# Altium PCB SOM_PCB.PcbDoc (part 4 of 5)
Units mil, origin at the board's own origin, x right, y up, seen from the top; angles counter-clockwise.
Board outline 6000 x 4000 mil, 8 copper layers (Top Layer, Int1 (Sign), Int2 (GND), Int3 (Sign), Int4 (Sign), Int5 (PWR), Int6 (Sign), Bottom Layer), stack 60.424 mil thick; 76 components, 194 nets, 972 pads, 571 vias.
Unrouted connection lines stored in the file: 54.
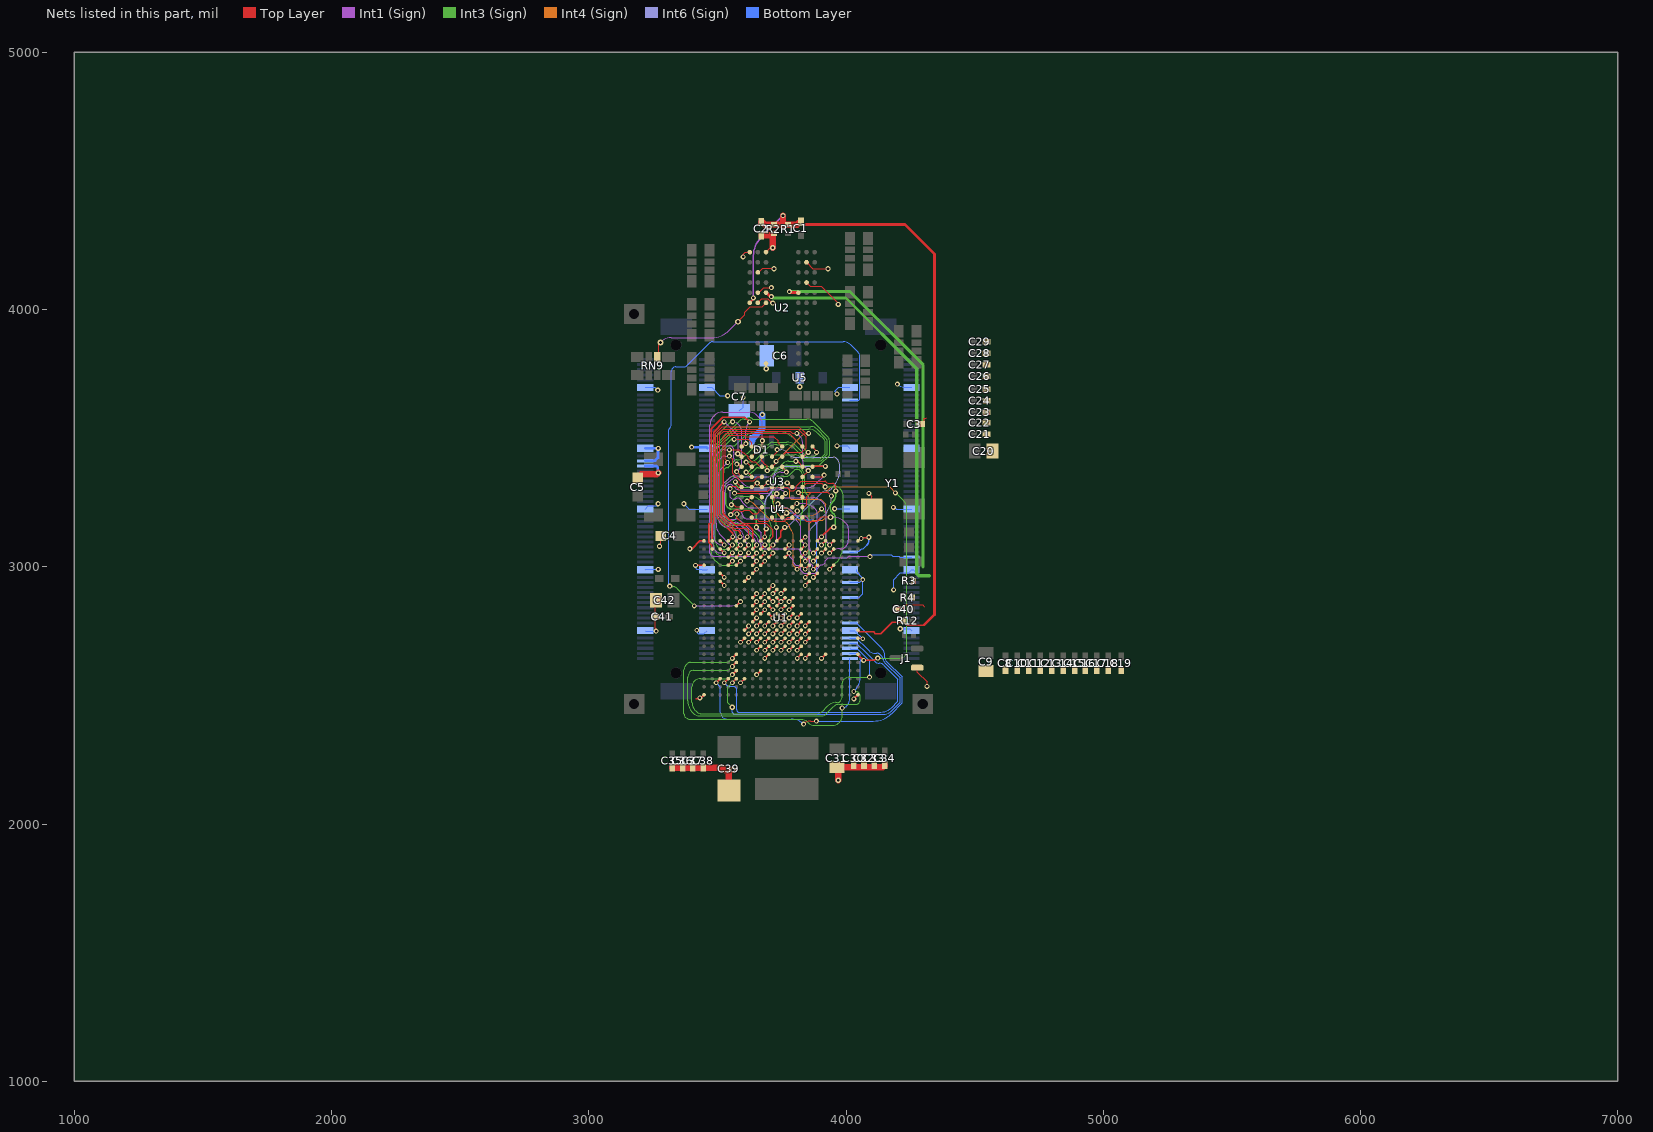
[diagram p9: the nets of this part, all layers, seen from the top]

## Via types
v1: diameter 19, hole 10, Top Layer to Bottom Layer, 330 vias
v2: diameter 20, hole 10, Top Layer to Bottom Layer, 235 vias
v3: diameter 23, hole 11.81, Top Layer to Bottom Layer, 6 vias

## Nets (pads, with @x,y where several pads share a name; then routed paths per layer and width w, separated by ;. In a path a pad name is that pad's centre, name@x,y a point inside that pad or via, vN(x,y) a via of type N, cw(c..) or ccw(c..) an arc to the next point about the centre after c; other vN are vias at no path point) (continued)
DDR_RES_DQM1: RN9.6 U2.F3 | length 528
  Top Layer w4: RN9.6@3271.35,3825 3271.35,3872.48 v3(3279.08,3872.5) ; v3(3580,3952.5) 3606.52,3979.02 3606.52,3989.15 3628.63,4011.26 3674.02,4011.26 U2.F3@3689.02,4026.26
  Int1 (Sign) w4: v3(3279.08,3872.5) 3280.02,3873.44 cw(c3320,3833.47) 3320,3890 3476.08,3890 ccw(c3476.08,3990) 3546.79,3919.29 v3(3580,3952.5)
DDR_RES_DQS0: R3.2 U2.E7 | length 1461.8
  Top Layer w12: v2(3779.94,4069.82) 3782.11,4069.82 3786.3,4065.63 U2.E7@3815,4065.63 ; R3.2@4262.52,2945 R3.2@4262.52,2946.77
  Int3 (Sign) w12: v2(3779.94,4069.82) 3780.12,4070 4015,4070 4300,3785 4300,3000
DDR_RES_DQS1: R4.2 U2.E3 | length 1566.8
  Top Layer w12: U2.E3@3689.02,4065.63 3690.64,4065.63 3704.74,4051.53 3708.47,4051.53 v2(3710,4050) ; R4.2@4257.52,2880 R4.2@4257.52,2887.52
  Int3 (Sign) w12: v2(3710,4050) 3715,4045 4000,4045 4275,3770 4275,2972.03 4282.03,2965 4325,2965
DDR_VREF: C1.1 C2.2 R1.1 R2.2 R12.2 U1.M20 U2.F1 | length 2908.6
  Top Layer w5: U2.F1@3626.02,4026.26 3640,4040.24 v2(3640,4045) ; U1.M20@4046.46,2754.02 4053.47,2747 4106.94,2747 4114.44,2739.5 4135.56,2739.5 4179.56,2783.5 4215.98,2783.5 R12.2@4222.48,2790 4222.48,2788.23 4239.02,2771.69 4301.69,2771.69 4305,2775
  Top Layer w10: C1.1@3823.34,4338.11 3830.84,4330.61 4229.39,4330.61 4344,4216 4344,2814 4305,2775
  Top Layer w25: C2.2@3670,4340 3670,4338.24 3671.66,4336.58 3678.14,4336.58 3684.64,4330.08 3719.96,4330.08 R2.2@3720,4330.04 3755.01,4330.04 ; v2(3755,4365) 3755.01,4330.04 ; C1.1@3823.34,4338.11 3818.42,4338.11 3810.36,4330.04 R1.1@3775,4330 R1.1@3775,4330 R1.1@3775,4330 3755.01,4330.04
  Int1 (Sign) w5: v2(3640,4045) 3640,4208.66 cw(c3740,4208.66) 3669.29,4279.37 v2(3755,4365) v2(3755,4365)
DR0PRI: U1.J5 U4.94 | length 2185.7
  Top Layer w5: U1.J5@3574.02,2848.5 v1(3589.76,2864.25)
  Int1 (Sign) w3: v1(3410,2848) 3550.53,2848 ccw(c3550.53,2903.49) v1(3589.76,2864.25)
  Int3 (Sign) w3: 3395,2863.5 3410,2848.5 v1(3410,2848)
  Int3 (Sign) w4: v2(3315,2925) 3317.5,2922.5 3326.75,2922.5 cw(c3326.75,2900.17) 3342.54,2915.96 3395,2863.5
  Bottom Layer w4: v2(3315,2925) cw(c3324.66,2934.66) 3311,2934.66 3311,3532.11 cw(c3319.54,3532.11) 3313.49,3538.14 3316,3540.65 ccw(c3303.93,3552.72) 3321,3552.72 3321,3759.98 cw(c3338.02,3759.98) 3325.97,3772 ; 3325.98,3772.02 cw(c3338.02,3759.98) 3338.02,3777 3365.69,3777 ccw(c3365.69,3804.31) 3384.99,3784.99 3470,3870 cw(c3482.07,3857.93) 3482.07,3875 3988.69,3875 cw(c3988.69,3833.69) 4017.85,3862.96 cw(c3988.69,3833.69) 4017.9,3862.9 4045.65,3835.15 cw(c4025.5,3815) 4054,3815 4054,3651.79 4050.15,3647.94 4015.19,3647.94 U4.94@4015,3647.76
F\L\A\S\H\_\A\S\M\0\: U1.A10 U3.B4 | length 713.8
  Top Layer w4: U3.B4@3712.52,3428.11 3713.32,3428.11 3732.2,3447 v2(3732.2,3455.35)
  Top Layer w5: U1.A10@3731.5,3100.47 3747.24,3116.22 3747.24,3138.24 v2(3762,3153)
  Int6 (Sign) w4: v2(3732.2,3455.35) 3745.94,3455.35 cw(c3745.94,3422.19) 3769.37,3445.64 ; v2(3762,3153) ccw(c3762,3175.63) 3768.65,3154 ccw(c3762,3175.63) 3778,3159.63 3905.15,3286.78 cw(c3925,3266.93) 3924.73,3295 cw(c3925,3266.93) 3924.97,3295 ccw(c3924.79,3319.66) 3942.24,3302.24 3946.63,3306.63 ccw(c3875.92,3377.34) 3975.92,3377.34 3975.92,3393.64 ccw(c3938.64,3393.64) 3965,3420 ccw(c3949.97,3404.97) 3949.97,3426.22 3802.52,3426.22 cw(c3802.52,3459.36) 3779.11,3435.91 ; 3769.38,3445.64 3779.09,3435.93
F\L\A\S\H\_\W\A\I\T\: U1.R20 U3.F7 | length 1270.9
  Top Layer w5: v2(3815,3288.13) 3830.63,3272.5 U3.F7@3830.63,3270.63 ; U1.R20@4046.46,2659.53 4046.46,2658.78 4068.29,2636.95 v1@4068.29,2636.2 ; v1(4068.65,2635.85) v1@4068.29,2636.2 ; v2(4123.43,2645) 4119.37,2645 4110.57,2636.2 v1@4068.29,2636.2
  Int3 (Sign) w4: v2(4123.43,2645) 4208.69,2645 ccw(c4208.69,2672.31) 4227.99,2652.99 ccw(c4208.69,2672.31) 4236,2672.31 4236,3230 ccw(c4200.99,3230) 4225.75,3254.75 4193.5,3287 v2(4192,3287)
  Int4 (Sign) w4: v2(3815,3288.13) 3816.87,3290 3910,3290 ccw(c3910,3318.07) 3929.85,3298.22 3933.88,3302.25 cw(c3955,3281.13) 3955,3311 4169.5,3311 4192,3288.5 v2(4192,3287)
FLASH_A1: U1.B2 U3.A1 | length 760.2
  Top Layer w5: U1.B2@3479.53,3068.98 3478.33,3070.17 3478.33,3083.74 3467.03,3095.04 3467.03,3164.53 3476.5,3174 3476.5,3536.66 3520.65,3580.81 3607.19,3580.81 3624.9,3563.09 v2(3625,3563) ; U3.A1@3594.41,3467.48 3597.06,3467.48 3608.35,3478.76 v2(3611,3478.76)
  Int1 (Sign) w4: v2(3611,3478.76) 3611,3529.2 cw(c3658.8,3529.2) 3617.78,3553.73 cw(c3658.8,3529.2) v2(3625,3563)
FLASH_A2: U1.A2 U3.B1 | length 646
  Top Layer w5: U1.A2@3479.53,3100.47 3479.53,3164.3 3485.5,3170.27 3485.5,3523.03 3525.47,3563 v2(3526.18,3563) ; v2(3579,3439.62) 3580.95,3439.62 3590.16,3430.41 U3.B1@3592.11,3430.41
  Int1 (Sign) w4: v2(3526.18,3563) 3578.75,3510.42 cw(c3573.33,3505) 3581,3505 3581,3447.16 3578.84,3445 3579.14,3444.7 3579.14,3440.67 v2(3579,3439.62)
FLASH_A3: U1.B3 U3.C1 | length 624.7
  Top Layer w4: v2(3575.71,3399.22) 3580.83,3396.94 3582.69,3396.94 3589.67,3389.96 U3.C1@3593.19,3389.96
  Top Layer w5: U1.B3@3511.02,3068.98 3511.41,3068.98 3526.39,3054 v1(3526.77,3054)
  Int1 (Sign) w3: 3479,3140 3479,3105.7 ccw(c3550.7,3105.7) 3495.27,3060.22 ccw(c3510.29,3075.24) 3503.85,3055 ccw(c3510.29,3075.24) 3510.29,3054 v1(3526.77,3054)
  Int1 (Sign) w4: 3479,3140 3479,3430 cw(c3512.8,3430) 3488.89,3453.89 3497.45,3462.45 cw(c3518.09,3441.81) 3518.09,3471 3546.05,3471 cw(c3546.05,3453.91) 3558.12,3466.01 ; 3558.13,3465.99 cw(c3545.12,3452.97) 3560.64,3462.88 cw(c3545.12,3452.97) 3563.53,3452.97 3563.53,3444.2 cw(c3559.53,3444.18) 3563.42,3443.26 ccw(c3579,3439.62) 3563,3439.74 ccw(c3579,3439.62) 3563,3439.53 ccw(c3579,3439.62) 3563.42,3435.97 cw(c3559.53,3435.05) 3563.53,3435.03 3563.53,3421.97 ccw(c3589.03,3421.97) 3563.63,3419.68 ccw(c3589.03,3421.97) 3569.9,3405.1 ccw(c3589.03,3421.97) 3571,3403.93 v2(3575.71,3399.22)
FLASH_A4: U1.D5 U3.D1 | length 954.5
  Top Layer w4: v2@3579.16,3365.84 3594.41,3350.59 U3.D1@3594.41,3349.37
  Top Layer w5: U1.D5@3574.02,3005.98 v1(3589.76,3021.73)
  Int1 (Sign) w4: v2(3559.13,3563.5) cw(c3559.13,3533.63) 3580.25,3554.75 3585,3550 cw(c3560.86,3525.86) 3595,3525.86 3595,3390 v2(3575,3370)
  Int3 (Sign) w3: 3476,3140 3476.5,3089.49 3476.5,3056.85 ccw(c3518.44,3056.85) 3476.88,3051.23 ccw(c3518.44,3056.85) 3488.78,3027.2 3499.39,3016.59 ccw(c3525,3042.2) 3525,3005.98 3551.74,3005.98 ccw(c3551.74,3059.75) v1@3589.74,3021.7
  Int3 (Sign) w4: 3476,3140 3476,3470 cw(c3517.31,3470) 3488.06,3499.17 3488.12,3499.23 3550.8,3561.91 3556.68,3563.78 v2(3559.13,3563.5)
FLASH_A5: U1.C4 U3.D2 | length 1408.4
  Top Layer w4: v2(3611.92,3367.69) 3621.38,3362.7 3633.78,3350.3 U3.D2@3633.78,3349.37
  Top Layer w5: U1.C4@3542.52,3037.48 3558.27,3053.23 v1(3558.27,3054)
  Int3 (Sign) w3: 3492,3140 3492,3101.79 ccw(c3525.29,3101.79) 3501.75,3078.25 ccw(c3525.29,3101.79) 3525.29,3068.5 3534.53,3068.5 cw(c3534.53,3046.19) 3550.3,3061.97 v1(3558.27,3054)
  Int3 (Sign) w4: 3492,3140 3492,3461.88 3575.12,3545 3863.1,3545 cw(c3863.1,3513.1) 3885.66,3535.66 3922.12,3499.19 cw(c3907.93,3485) 3928,3485 3928,3436.69 3903.31,3412 3838.94,3412 cw(c3838.94,3420) 3833.29,3414.34 3821.4,3426.22 ccw(c3800.22,3405.04) 3800.22,3435 3703.13,3435 ccw(c3703.13,3393.37) 3673.69,3422.81 3623.28,3372.39 cw(c3611.92,3383.75) v2(3611.92,3367.69)
FLASH_A6: U1.C7 U3.A2 | length 685.9
  Top Layer w4: v2(3565,3495) 3566,3496 3620.11,3496 3633.78,3482.33 U3.A2@3633.78,3467.48
  Top Layer w5: U1.C7@3637.01,3037.48 v1(3652.76,3053.23)
  Int3 (Sign) w3: 3620,3140 3631.86,3128.14 cw(c3619.45,3115.72) 3637.01,3115.72 3637.01,3078.76 ccw(c3660.63,3078.76) 3643.93,3062.06 v1(3652.76,3053.23)
  Int3 (Sign) w4: 3517.17,3177.83 cw(c3539.37,3199.99) 3508,3199.91 cw(c3539.37,3199.99) 3508,3199.99 3508,3449.56 3557.44,3499 3561.44,3495 v2(3565,3495) ; 3517.19,3177.81 3526.22,3168.78 ccw(c3545,3187.56) 3545,3161 3576.37,3161 cw(c3576.37,3106.37) 3614.98,3145.02 ; 3610,3150 3614.98,3145.02 ; 3620,3140 3614.98,3145.02
FLASH_A7: U1.C5 U3.C2 | length 1384
  Top Layer w4: v2(3611.88,3406.88) 3613.76,3406.88 3631.9,3388.74 U3.C2@3633.78,3388.74
  Top Layer w5: U1.C5@3574.02,3037.48 3589.76,3053.23 v1(3589.76,3054)
  Int3 (Sign) w3: 3572.47,3140 cw(c3556.87,3132.91) 3574.01,3132.91 3574.01,3124.35 3574,3116.23 ; 3574,3116.22 3574.01,3092.6 3574.01,3092.04 ccw(c3627.8,3092.04) 3574.01,3091.86 ccw(c3627.8,3092.04) v1(3589.76,3054)
  Int3 (Sign) w4: 3572.47,3140 ccw(c3556.87,3132.91) 3568.99,3145.03 ccw(c3552.16,3128.2) 3552.16,3152 3539.31,3152 cw(c3539.31,3179.31) 3520.01,3159.99 3507.07,3172.93 cw(c3524.14,3190) 3500,3190 3500,3458.57 3563.3,3521.87 cw(c3595,3490.17) 3595,3535 3624.3,3535 cw(c3624.3,3533.36) 3625.46,3534.52 3625.84,3534.6 3855,3534.6 cw(c3855,3486.93) 3885.37,3523.67 cw(c3855,3486.93) 3888.71,3520.64 3894.04,3515.31 3912.85,3497.15 cw(c3910.09,3494.25) 3912.93,3497.07 cw(c3895.86,3480) 3920,3480 3920,3440 3900,3420 3838.94,3420 3795.26,3463.68 ccw(c3767.93,3436.34) 3767.93,3475 3730,3475 ccw(c3730,3423.54) 3693.62,3459.93 3657.48,3423.79 cw(c3616.64,3464.63) 3616.64,3406.88 v2(3611.88,3406.88)
FLASH_A8: U1.D7 U3.A3 | length 1059.7
  Top Layer w4: U3.A3@3673.15,3467.48 3675,3469.33 v2(3675,3490)
  Top Layer w5: U1.D7@3637.01,3005.98 v1(3652.76,3021.73)
  Int1 (Sign) w3: 3471,3140 3471,3054.66 ccw(c3484.66,3054.66) 3475,3045 ccw(c3487.07,3057.07) 3487.07,3040 3634.49,3040 v1(3652.76,3021.73)
  Int1 (Sign) w4: 3471,3140 3471,3550 cw(c3521.7,3550) 3485.83,3585.83 3487.57,3587.57 ; 3487.59,3587.59 cw(c3520,3555.13) 3520,3601 3623.78,3601 cw(c3623.78,3558.52) 3653.79,3588.58 ; 3653.81,3588.56 3666.25,3576.12 cw(c3645.13,3555) 3675,3555 v2(3675,3490)
FLASH_A9: U1.C6 U3.B3 | length 1490.1
  Top Layer w4: U3.B3@3673.15,3428.11 3673.15,3412.28 ccw(c3677.15,3412.28) 3674.29,3409.49 3684.97,3398.55 ccw(c3696.4,3409.75) 3685.25,3398.27 3692.55,3391.19 cw(c3689.77,3388.3) 3693.77,3388.36 3693.77,3374.13 v2(3693.9,3374)
  Top Layer w5: U1.C6@3605.51,3037.48 3621.26,3053.23 v1(3621.26,3054)
  Int3 (Sign) w3: 3484,3140 3485.09,3101.91 3485.09,3083.84 ccw(c3530.79,3083.84) 3485.84,3075.6 ccw(c3530.79,3083.84) 3498.47,3051.53 ; 3498.49,3051.51 ccw(c3528.17,3081.22) 3528.17,3039.23 3590,3039.23 ccw(c3590,3080.9) v1@3619.45,3051.42 ; v1@3619.46,3051.43 v1@3621.26,3053.23
  Int3 (Sign) w4: 3484,3140 3484,3465.2 3584.69,3565.89 cw(c3604.27,3546.31) 3604.27,3574 3611.77,3574 ccw(c3611.77,3578) 3614.42,3575 cw(c3625,3563) 3622.92,3578.86 cw(c3625,3563) 3626.23,3578.95 cw(c3625,3563) 3635.58,3575 ccw(c3638.23,3578) 3638.23,3574 3758.32,3574 3848.27,3574 cw(c3848.27,3543.27) 3870,3565 3929.64,3505.36 cw(c3914.27,3490) 3936,3490 3936,3433.37 3900.63,3398 cw(c3891.51,3407.11) 3891.51,3394.22 3771.09,3394.22 ccw(c3771.09,3364.82) 3750.32,3385.63 ; v2(3693.9,3374) 3696.9,3377 3729.24,3377 ; 3728.34,3377 3729.24,3377 ; 3750.3,3385.61 3749.83,3385.14 cw(c3730.15,3404.85) 3730.23,3377 cw(c3730.15,3404.85) 3730.15,3377 3729.24,3377
FLASH_A10: U1.A3 U3.C3 | length 617.1
  Top Layer w4: v2(3546.5,3454.12) 3547.99,3455.62 3585.77,3455.62 3598.77,3442.61 3603.39,3442.61 3619.28,3426.72 3619.28,3422.1 3633.44,3407.95 3647.05,3407.95 3663.77,3391.23 3670.66,3391.23 U3.C3@3673.15,3388.74
  Top Layer w5: U1.A3@3511.02,3100.47 v1(3526.77,3084.72)
  Int1 (Sign) w3: 3487,3140 3487,3114.31 ccw(c3514.31,3114.31) 3495,3095 ccw(c3519.81,3119.81) 3519.81,3084.72 v1(3526.77,3084.72)
  Int1 (Sign) w4: 3487,3140 3487,3410 cw(c3528.04,3410) 3499.02,3439.02 3507.01,3447.01 cw(c3526.3,3427.72) 3526.3,3455 3545.62,3455 v2(3546.5,3454.12)
FLASH_A11: U1.B4 U3.D3 | length 632.8
  Top Layer w4: v2(3546.5,3430) 3559,3417.5 3559,3363.37 3576.37,3346 3576.63,3346 3587.76,3334.87 3602.24,3334.87 3602.37,3335 3627.63,3335 3627.76,3334.87 3642.24,3334.87 3656.74,3349.37 U3.D3@3673.15,3349.37
  Top Layer w5: U1.B4@3542.52,3068.98 v1(3558.27,3084.72)
  Int1 (Sign) w3: 3501.13,3140 ccw(c3563.28,3168.28) 3515,3120 3544.62,3090.38 ccw(c3558.27,3104.02) v1(3558.27,3084.72)
  Int1 (Sign) w4: 3501.13,3140 cw(c3563.28,3168.28) 3495,3168.28 3495,3390 cw(c3531.21,3390) 3505.61,3415.61 3512.8,3422.8 cw(c3530.18,3405.43) 3530.18,3430 v2(3546.5,3430)
FLASH_A12: U1.A4 U3.C4 | length 1034
  Top Layer w4: 3540.37,3150.37 3494,3196.74 3494,3519.51 3519.49,3545 3816.46,3545 3841.29,3520.17 v2(3854.44,3518.6) ; U3.C4@3712.52,3388.74 3713.74,3388.74 3729.56,3404.56 3729.56,3406.22 v2(3728.53,3409.57)
  Top Layer w5: 3540.37,3150.37 3560,3130.74 3560,3118.15 v1(3559.61,3116.41) ; U1.A4@3542.52,3100.47 3544,3100.47 v1@3560,3116.48
  Int4 (Sign) w4: v2(3728.53,3409.57) 3825.62,3506.66 cw(c3854.44,3477.84) v2(3854.44,3518.6)
FLASH_A13: U1.B5 U3.A5 | length 744.4
  Top Layer w4: v2(3539.57,3405.43) 3538.74,3409.88 3530.5,3418.13 3530.5,3499.44 3542.06,3511 3606.12,3511 3611.12,3506 3719.37,3506 3736.39,3488.99 3736.39,3482.98 U3.A5@3751.89,3467.48
  Top Layer w5: U1.B5@3574.02,3068.98 v1(3589.76,3084.72)
  Int1 (Sign) w3: 3564.1,3140 cw(c3527.67,3111.38) 3574,3111.38 ccw(c3600.3,3111.38) 3581.69,3092.8 v1(3589.76,3084.72)
  Int1 (Sign) w4: 3514.47,3380.47 ccw(c3539.85,3355.15) 3504,3355.15 3504,3191.56 ccw(c3541.56,3191.56) 3515,3165 ccw(c3539.14,3189.14) 3534.71,3155.29 3541.19,3155.29 cw(c3541.19,3135.76) 3544.54,3155 cw(c3541.19,3135.76) 3555,3149.57 3560.43,3144.14 cw(c3527.67,3111.38) 3564.1,3140 ; 3514.5,3380.5 3539.43,3405.43 v2(3539.57,3405.43)
FLASH_A14: U1.A5 U3.B5 | length 982
  Top Layer w4: U1.A5@3574.02,3100.47 U1.A5@3574.02,3101.35 ; 3582.24,3140 3581.24,3141 3562.69,3141 3506.5,3197.19 3502,3201.69 3502,3504.88 3502,3516.2 3520.8,3535 3815.15,3535 3845.13,3505.02 3845.13,3461.47 3828.04,3444.38 3768.16,3444.38 U3.B5@3751.89,3428.11 ; v1@3588,3115.34 v1(3588,3116.22)
  Top Layer w5: U1.A5@3574.02,3101.35 v1@3588,3115.34 ; 3582.24,3140 3589.26,3132.97 v1@3589.26,3116.72
FLASH_A15: U1.B6 U3.C5 | length 607.4
  Top Layer w4: U3.C5@3751.89,3388.74 3751.89,3386.93 3767.31,3371.5 3767.31,3371.07 v2(3768.51,3368.21)
  Top Layer w5: U1.B6@3605.51,3068.98 v1(3621.26,3084.72)
  Int1 (Sign) w3: 3590.4,3140 3593.37,3137.03 ; 3593.38,3137.02 cw(c3572.53,3116.19) 3602,3116.19 ccw(c3631.47,3116.19) 3610.62,3095.37 ; 3610.63,3095.35 v1(3621.26,3084.72)
  Int1 (Sign) w4: 3520.62,3183.07 3529.24,3174.44 ccw(c3552.04,3197.24) 3552.04,3165 cw(c3552.04,3132.76) 3574.82,3155.57 ; 3520.61,3183.08 cw(c3541.43,3203.88) 3512,3203.88 3512,3292.93 cw(c3557.07,3292.93) 3525.2,3324.8 3545.37,3344.97 cw(c3567.17,3323.17) 3567.17,3354 3593.22,3354 cw(c3593.22,3344.42) 3600,3351.19 ccw(c3602.88,3354.07) 3602.88,3350 3703.44,3350 ccw(c3703.44,3386.94) 3718.42,3353.17 ccw(c3703.44,3386.94) 3729.56,3360.82 cw(c3747.41,3342.97) 3747.41,3368.21 v2(3768.51,3368.21) ; 3574.84,3155.56 3590.4,3140
FLASH_A16: U1.A6 U3.D7 | length 1001.8
  Top Layer w4: v1@3618.63,3113.59 3621.26,3116.22 3621.26,3143.74 3615,3150 3565,3150 3510,3205 3510,3512.88 3524.12,3527 3782.42,3527 3790.83,3518.6 v2(3808.92,3518.6) ; U3.D7@3830.63,3349.37 3853,3371.74 v2(3853,3374)
  Top Layer w5: U1.A6@3605.51,3100.47 3605.51,3102.91 3616.19,3113.58 3618.62,3113.58 v1(3616,3116.21)
  Int1 (Sign) w4: v2(3808.92,3518.6) 3822.85,3504.66 cw(c3803.19,3485) 3831,3485 3831,3410 ccw(c3864.06,3410) 3840.68,3386.62 3853,3374.3 v2(3853,3374)
FLASH_A17: U1.B7 U3.D8 | length 804.1
  Top Layer w4: U3.D8@3870,3349.37 3909.37,3349.37 3914.63,3354.63 v2(3914.63,3356.55)
  Top Layer w5: U1.B7@3637.01,3068.98 v1(3652.76,3084.72)
  Int1 (Sign) w3: 3612.01,3140 3642.48,3109.52 cw(c3617.69,3084.72) v1(3652.76,3084.72)
  Int1 (Sign) w4: 3581.31,3341.31 3596.07,3326.56 ccw(c3640.88,3371.37) 3640.88,3308 3851.03,3308 ccw(c3851.03,3348.97) 3880,3320 3914.63,3354.63 v2(3914.63,3356.55) ; 3581.3,3341.33 ccw(c3570,3330) 3570,3346 ccw(c3570,3330) 3560.15,3342.61 3534.75,3322.78 ccw(c3549.51,3303.86) 3532.54,3320.83 3530.85,3319.13 ccw(c3557.07,3292.93) 3520,3292.93 3520,3210 ccw(c3556.21,3210) 3530.61,3184.39 3532.56,3182.44 ccw(c3555.36,3205.24) 3555.36,3173 3568.71,3173 cw(c3568.71,3148.15) 3586.29,3165.72 3612.01,3140
FLASH_A18: U1.A7 U3.A7 | length 818.5
  Top Layer w4: 3523,3414.13 3522.5,3414.63 3522.5,3507.5 3534,3519 3779.11,3519 U3.A7@3830.63,3467.48
  Top Layer w5: 3523,3414.13 3523,3207 3569.11,3160.89 3620,3160.89 3637.01,3143.88 U1.A7@3637.01,3100.47
FLASH_A19: U1.C8 U3.B7 | length 943.6
  Top Layer w4: U3.B7@3830.63,3428.11 3833.64,3428.11 3849.53,3444 3851.03,3444 v2(3853.25,3444.6)
  Top Layer w5: U1.C8@3668.5,3037.48 v1(3684.25,3053.23)
  Int3 (Sign) w3: 3641.44,3140 3656.83,3124.62 cw(c3628.63,3096.42) 3668.5,3096.42 3668.5,3082.7 ccw(c3701.63,3082.7) v1@3678.2,3059.28 ; v1@3678.21,3059.27 v1(3684.25,3053.23)
  Int3 (Sign) w4: 3641.44,3140 3621.24,3160.2 ccw(c3600,3138.96) 3600,3169 3555,3169 cw(c3555,3200.39) 3532.81,3178.19 3523.07,3187.93 cw(c3540.14,3205) 3516,3205 3516,3446.25 3539.87,3470.12 3567.11,3470.12 3592.7,3495.71 cw(c3663.41,3425) 3663.41,3525 3735,3525 cw(c3735,3436.8) 3797.37,3499.17 3851.06,3445.48 v2(3853.25,3444.6)
FLASH_A20: U1.B8 U3.C7 | length 711.9
  Top Layer w4: v2(3805.19,3410.22) 3811.96,3410.22 3830.63,3391.56 U3.C7@3830.63,3388.74
  Top Layer w5: U1.B8@3668.5,3068.98 v1(3684.66,3085.14)
  Int1 (Sign) w3: 3662.5,3140 3670,3132.5 3670,3098.98 3683.84,3085.14 v1(3684.66,3085.14)
  Int1 (Sign) w5: v2@3655,3147.5 3662.5,3140
  Int3 (Sign) w4: 3532,3284.94 3532,3325 cw(c3546.97,3325) 3536.39,3335.59 3545.3,3344.5 cw(c3565,3311.96) 3565,3350 3605.34,3350 ccw(c3605.34,3379.66) 3626.31,3358.69 3648.88,3381.25 cw(c3657.92,3372.21) 3657.92,3385 3680.67,3385 ccw(c3680.67,3389) 3683.32,3386 cw(c3693.9,3374) 3693.9,3390 cw(c3693.9,3374) 3704.48,3386 ccw(c3707.13,3389) 3707.13,3385 3728.36,3385 3728.43,3385 3730.15,3385 ccw(c3730.15,3404.85) 3730.21,3385 ccw(c3730.15,3404.85) 3744.19,3390.81 3753.89,3400.52 ; 3753.9,3400.53 cw(c3777.32,3377.09) 3777.32,3410.22 v2(3805.19,3410.22)
  Int3 (Sign) w5: 3532.5,3284.94 3532.5,3244.62 ccw(c3537.5,3244.62) 3532.6,3243.6 ; 3532.61,3243.56 ccw(c3559.31,3249.31) 3538.88,3231.18 ; 3538.91,3231.15 ccw(c3542.62,3234.5) 3540.13,3230.17 3546.4,3226.56 ccw(c3554.64,3240.86) 3554.8,3224.36 3620.86,3225 cw(c3620.86,3190.86) 3645,3215 cw(c3629.06,3199.06) 3651.6,3199.06 v2(3651.6,3153.39)
FLASH_A21: U1.A8 U3.C8 | length 545.9
  Top Layer w5: U1.A8@3668.5,3100.47 v1(3684.25,3116.22) 3684.25,3137.21 3690.18,3143.14 v2(3690.18,3147.19) ; U3.C8@3870,3388.74 3871.26,3390 v2(3920,3390)
  Int4 (Sign) w5: v2@3919.5,3390.5 v2(3920,3390)
  Int6 (Sign) w5: v2(3690.18,3147.19) 3690.18,3148.22 3684.89,3153.5 3684.89,3245 cw(c3732.93,3245) 3698.96,3278.95 3703.18,3283.18 ccw(c3666.19,3320.17) 3718.5,3320.17 3718.5,3345.17 cw(c3774.83,3345.17) 3730.35,3379.73 cw(c3756.35,3353.72) 3756.35,3390.5 v2@3919.5,3390.5
FLASH_A22: U1.A9 U3.A8 | length 938
  Top Layer w4: v2(3575.87,3205.17) 3575.87,3189.92 3596.4,3169.39 3690.61,3169.39 3715.75,3144.25 3715.75,3140 ; U1.A9@3700,3100.47 3715.75,3116.22 ; U3.A8@3870,3467.48 3870,3463.96 3885.33,3448.63 v2(3885.33,3444.6)
  Top Layer w5: 3715.75,3116.22 3715.75,3140
  Int3 (Sign) w4: 3531.59,3190.72 3534.66,3187.66 ccw(c3553.14,3206.14) 3553.14,3180 3557.93,3180 ccw(c3557.93,3197.07) 3570,3185 ccw(c3555.82,3199.18) 3575.87,3199.18 v2(3575.87,3205.17) ; 3531.58,3190.73 cw(c3549.92,3209.05) 3524,3209.05 3524,3365 cw(c3542.41,3365) 3524.12,3367.11 ccw(c3520.15,3367.57) 3524.12,3368.06 cw(c3540,3370) 3524,3370 cw(c3540,3370) 3526.37,3378.37 3530.02,3382.02 ccw(c3528.24,3385.61) 3530.63,3382.4 cw(c3540.19,3369.57) 3540.42,3385.57 ccw(c3540.47,3389.57) 3542.88,3386.37 ccw(c3530.02,3403.21) 3545,3388.23 3550.88,3394.12 ccw(c3539.57,3405.43) 3553.94,3398.39 ccw(c3539.57,3405.43) 3554.81,3400.56 ccw(c3539.57,3405.43) 3554.85,3400.7 cw(c3558.68,3399.52) 3555.28,3401.63 3560.86,3407.21 3565.94,3412.29 cw(c3574.89,3403.34) 3574.89,3416 3579.05,3416 ccw(c3579.05,3447.25) 3594.35,3420 ccw(c3579.05,3447.25) 3601.15,3425.15 3631.71,3455.71 cw(c3702.42,3385) 3644.83,3466.75 cw(c3662.36,3449.22) 3654.32,3472.67 cw(c3662.36,3449.22) 3662.36,3474.01 3674.42,3474.01 ccw(c3675,3490) 3675.52,3474.01 ; 3675.56,3474.01 cw(c3675.65,3470.01) 3675.68,3474.01 3690.54,3474.01 ccw(c3690.54,3494.46) 3705,3480 3706.46,3481.46 cw(c3715,3472.93) 3715,3485 3770,3485 cw(c3770,3436.72) 3804.14,3470.86 3840.99,3434.01 ccw(c3855.49,3448.51) 3855.49,3428 3867.83,3428 ccw(c3867.83,3447.4) 3881.55,3433.68 3885.33,3437.46 v2(3885.33,3444.6)
FLASH_A23: U1.C9 U3.G1 | length 425.9
  Top Layer w4: v2(3554.64,3240.86) 3557.43,3241.56 3564.27,3240.73 3571.37,3233.63 3592.04,3233.63 U3.G1@3594.41,3231.26
  Top Layer w5: U1.C9@3700,3037.48 v1(3715.75,3053.23)
  Int3 (Sign) w3: 3710,3140 3710,3133.6 cw(c3691.12,3133.6) 3708.89,3127.22 cw(c3706.07,3128.26) 3708.59,3126.62 3704.65,3120.56 ccw(c3707.16,3118.93) 3704.46,3120.23 ccw(c3729.92,3108.17) 3701.75,3108.17 3701.75,3087.03 ccw(c3749.55,3087.03) v1(3715.75,3053.23)
  Int3 (Sign) w4: v2(3554.64,3240.86) 3555.05,3242.27 3555.25,3242.96 3556.12,3244.65 cw(c3586.5,3243.5) 3565,3265 cw(c3589.14,3240.86) 3589.14,3275 3625,3275 cw(c3625,3214.64) 3667.68,3257.32 3675,3250 cw(c3650.86,3225.86) 3685,3225.86 3685,3207.5 ccw(c3715.18,3207.5) 3693.84,3186.16 3699.39,3180.61 cw(c3673.79,3155) 3710,3155 3710,3140
FLASH_A24: U1.D8 | length 22.3
  Top Layer w5: U1.D8@3668.5,3005.98 v1(3684.25,3021.73)
FLASH_CLK: U1.B9 U3.E6 | length 336.3
  Top Layer w4: v2(3771.57,3325.92) 3773.46,3325.92 3789.38,3310 U3.E6@3791.26,3310
  Top Layer w5: U1.B9@3700,3068.98 3715.28,3084.26 v1(3715.83,3084.73)
  Int1 (Sign) w3: v1(3715.83,3084.73) 3730.65,3100.04 ccw(c3728.5,3102.13) 3731.5,3102.13 3731.5,3140
  Int1 (Sign) w4: v2(3729.6,3153) 3729.74,3153 3731.5,3151.24 3731.5,3140
  Int3 (Sign) w4: v2(3729.6,3153) 3729.6,3216.42 ccw(c3704.62,3216.42) 3722.28,3234.09 cw(c3739.95,3251.76) 3714.97,3251.76 3714.97,3285 cw(c3734.27,3285) 3720.61,3298.64 3740.97,3319 cw(c3757.68,3302.29) 3757.68,3325.92 v2(3771.57,3325.92)
FLASH_D0: U1.D13 U3.F2 | length 446.3
  Top Layer w4: v2(3615,3255) 3616.57,3255 3632.2,3270.63 U3.F2@3633.78,3270.63
  Top Layer w5: v1(3810.24,2990.24) U1.D13@3825.98,3005.98
  Int4 (Sign) w3: 3789.09,3140 cw(c3762.09,3122.09) 3794.49,3122.09 3794.49,3005.98 v1(3810.24,2990.24) ; 3789.19,3140 cw(c3763.41,3122.64) 3794.49,3122.64
  Int4 (Sign) w4: v2(3615,3255) 3617.23,3255 cw(c3617.23,3217.23) 3643.91,3243.96 ; 3643.94,3243.94 3698.94,3188.94 ; 3698.95,3188.92 ccw(c3727.75,3217.75) 3727.75,3177 3751.64,3177 cw(c3751.64,3145.04) 3770.58,3170.78 cw(c3751.64,3145.04) 3774.22,3167.65 ; 3774.24,3167.64 3776.6,3165.28 cw(c3768.39,3157.07) 3780,3157.07 ccw(c3797.07,3157.07) 3785,3145 cw(c3762.09,3122.09) 3789.09,3140
FLASH_D1: U1.C13 U3.E2 | length 613.1
  Top Layer w4: U3.E2@3633.78,3310 3636.89,3310 3651.89,3325 v2(3655,3325)
  Top Layer w5: U1.C13@3825.98,3037.48 v1(3841.73,3053.23)
  Int4 (Sign) w3: v1(3841.73,3053.23) 3857.48,3068.98 3857.48,3140
  Int4 (Sign) w4: v2(3655,3325) 3671,3309 3771,3309 3781,3299 3781,3269 3788.01,3261.99 3901.67,3261.99 3921,3242.66 3921,3191 3910,3180 3870,3180 3857.48,3167.48 3857.48,3140
FLASH_D2: U1.B13 U3.G3 | length 566.9
  Top Layer w4: v2(3551.87,3202.5) 3551.87,3206.14 3566.91,3221.17 3582.5,3221.17 3586.91,3216.76 3600.42,3216.76 3603.84,3220.18 3624.35,3220.18 3638.14,3206.39 3655.83,3206.39 3663.25,3213.81 3663.25,3220.66 3673.15,3230.56 U3.G3@3673.15,3231.26
  Top Layer w5: U1.B13@3825.98,3068.98 v1(3841.73,3084.72)
  Int1 (Sign) w3: 3824,3140 3824,3133.08 3824.24,3132.84 3824.24,3102.22 v1(3841.73,3084.72)
  Int1 (Sign) w4: v2(3551.87,3202.5) 3551.87,3203.8 3560.56,3212.49 ; 3560.58,3212.51 cw(c3581.53,3191.52) 3562.64,3214.38 ccw(c3560.1,3217.47) 3563.25,3215.01 cw(c3575.87,3205.17) 3564.55,3216.47 ; 3564.57,3216.5 cw(c3575.87,3205.17) 3575.87,3221.17 cw(c3575.87,3205.17) 3577.84,3221.05 cw(c3577.84,3209.51) 3578.57,3221.03 cw(c3577.84,3209.51) 3585.99,3217.68 ; 3586,3217.67 3594.26,3209.41 ; 3594.28,3209.39 cw(c3579.59,3194.74) 3596.53,3206.72 cw(c3593.25,3204.43) 3597.25,3204.4 ccw(c3613.25,3204.18) 3600.34,3194.74 ccw(c3613.25,3204.18) 3601.38,3193.46 ccw(c3613.25,3204.18) 3601.93,3192.89 ; 3601.95,3192.86 ccw(c3613.25,3204.18) 3607.18,3189.38 cw(c3605.66,3185.68) 3607.5,3189.24 ccw(c3620.79,3214.91) 3620.79,3186 3786.24,3186 cw(c3786.24,3148.24) 3812.91,3174.97 ; 3812.94,3174.94 3815.56,3172.33 ; 3815.57,3172.31 cw(c3795.17,3151.94) 3824,3151.94 3824,3140
FLASH_D3: U1.B15 U3.E4 | length 721.4
  Top Layer w4: v2(3549.51,3303.86) 3548.37,3305 3548.37,3313 3570.9,3313 3590.77,3293.13 3695.65,3293.13 U3.E4@3712.52,3310
  Top Layer w5: v1(3873.23,3053.23) U1.B15@3888.98,3068.98
  Int1 (Sign) w3: 3857.48,3140 3857.48,3068.98 v1(3873.23,3053.23)
  Int1 (Sign) w4: v2(3549.51,3303.86) 3549.51,3271.17 ccw(c3551.17,3271.17) 3550,3270 ccw(c3571,3291) 3566.86,3261.59 ccw(c3567.42,3265.55) 3569.94,3262.44 cw(c3580,3250) 3576.19,3265.54 ; 3576.23,3265.55 cw(c3580,3250) 3591.33,3261.3 cw(c3580,3250) 3595.09,3255.33 ; 3595.1,3255.29 cw(c3580,3250) 3595.78,3252.64 ccw(c3599.73,3253.3) 3596.9,3250.48 3608.62,3238.76 ccw(c3631.82,3261.97) 3631.82,3229.15 3757.67,3229.15 cw(c3757.67,3185.84) 3788.29,3216.46 3799.32,3205.42 ccw(c3814.83,3220.93) 3814.83,3199 3828.27,3199 cw(c3828.27,3168.27) 3850,3190 cw(c3831.94,3171.94) 3857.48,3171.94 3857.48,3140
FLASH_D4: U1.A15 U3.E5 | length 501.7
  Top Layer w4: U3.E5@3751.89,3310 3769.09,3310 3783.59,3295.5 3797.27,3295.5 3805.76,3303.99 3805.76,3313.13 3825.13,3332.5 3918.22,3332.5 ; 3918.24,3332.5 cw(c3918.18,3328.5) 3920.99,3331.34 3923.77,3328.6 ccw(c3935,3340) 3934.97,3324 3949.35,3323.97 cw(c3949.37,3319.97) 3952.16,3322.84 3961,3314 v2@3961,3295
  Top Layer w5: U1.A15@3888.98,3100.47 v1(3904.72,3116.22) 3940,3151.5 3947.47,3151.5 v2(3952.41,3153.66)
  Int3 (Sign) w5: 3947.06,3209.61 3948.17,3208.5 ; 3947.04,3209.63 cw(c3967.72,3230.27) 3938.5,3230.27 cw(c3967.72,3230.27) 3947.06,3250.93 3949.25,3253.12 ccw(c3923.3,3279.07) 3960,3279.07 v2(3960,3295) ; 3948.18,3208.49 cw(c3940,3192.46) 3952.7,3205.21 cw(c3940,3192.46) 3957.57,3196.39 3958.01,3194.42 3958.01,3181.25 3958.01,3167.89 cw(c3938.88,3167.89) 3953.38,3155.42 v2(3952.41,3153.66)
FLASH_D5: U1.B16 U3.G5 | length 424.9
  Top Layer w4: v2(3735,3245.15) 3737.07,3244 3749.82,3231.26 U3.G5@3751.89,3231.26
  Top Layer w5: v1(3904.72,3053.23) U1.B16@3920.47,3068.98
  Int3 (Sign) w3: v1(3904.72,3053.23) 3921,3069.5 3921,3140
  Int3 (Sign) w4: v2(3905,3225) 3921,3209 3921,3140
  Int4 (Sign) w4: v2(3735,3245.15) 3736.13,3242.87 3746.43,3232.57 ccw(c3757.41,3243.56) 3757.41,3228.02 3763.85,3228.02 cw(c3763.85,3202.68) 3781.77,3220.6 3792.57,3209.8 ccw(c3818.65,3235.87) 3818.65,3199 3860,3199 ccw(c3860,3244.87) 3892.44,3212.44 v2(3905,3225)
FLASH_D6: U1.A16 U3.G6 | length 271.9
  Top Layer w4: U3.G6@3791.26,3231.26 3792.77,3231.26 3807.49,3245.99 v2(3809,3245.99)
  Top Layer w5: v1(3904.72,3084.72) U1.A16@3920.47,3100.47
  Int1 (Sign) w3: 3888.98,3140 3888.98,3100.47 v1(3904.72,3084.72)
  Int1 (Sign) w4: v2(3809,3245.99) 3829.34,3245.99 cw(c3829.34,3174.34) 3841.18,3245 cw(c3829.34,3174.34) 3880,3225 cw(c3858.33,3203.33) 3888.98,3203.33 3888.98,3140
FLASH_D7: U1.B17 U3.H7 | length 378.9
  Top Layer w4: U3.H7@3830.63,3191.89 3845.13,3177.39 3885.72,3177.39 3903.33,3195 3937.46,3195 v3(3940,3192.46)
  Top Layer w5: v1(3936.22,3053.23) U1.B17@3951.97,3068.98
  Int1 (Sign) w3: v1(3936.22,3053.23) 3937.43,3054.44 cw(c3975,3016.87) 3975,3070 3982.93,3070 ccw(c3982.93,3087.07) 3995,3075 3998.36,3078.36 ccw(c3970.24,3106.47) 4010,3106.47 4010,3140
  Int1 (Sign) w4: v3(3940,3192.46) 3945.78,3192.46 cw(c3945.78,3115.78) 4000,3170 cw(c3975.86,3145.86) 4010,3145.86 4010,3140
FLASH_D8: U1.C14 U3.E1 | length 719.9
  Top Layer w4: v2(3570,3330) 3572.2,3330 3592.2,3310 U3.E1@3594.41,3310
  Top Layer w5: v1(3841.73,3021.73) U1.C14@3857.48,3037.48
  Int3 (Sign) w3: 3824.32,3140 3824.32,3039.15 v1(3841.73,3021.73)
  Int3 (Sign) w4: v2(3570,3330) 3570,3320 3581,3309 3695,3309 ccw(c3695,3326.96) 3707.7,3314.26 3713.32,3319.88 ccw(c3699.61,3333.59) 3719,3333.59 3719,3334.64 cw(c3735.88,3334.64) 3723.94,3346.56 ; 3723.95,3346.58 cw(c3735.88,3334.64) 3735.88,3351.51 3765,3351.51 ccw(c3765,3376.69) 3782.78,3358.87 ; 3782.8,3358.89 3796.93,3373.02 cw(c3809.49,3360.46) 3809.49,3378.22 3813.17,3378.22 cw(c3813.17,3369.34) 3819.44,3375.63 ; 3819.45,3375.62 3825.23,3369.85 cw(c3811.29,3355.91) 3831,3355.91 3831,3213.12 cw(c3825.3,3213.12) 3829.34,3209.1 3827.66,3207.42 ccw(c3835.73,3199.35) 3824.32,3199.35 3824.32,3140
FLASH_D9: U1.C15 U3.E3 | length 591.9
  Top Layer w4: U3.E3@3673.15,3310 3676.67,3310 3693.86,3327.19 v2(3698,3327.19)
  Top Layer w5: v1(3873.23,3021.73) U1.C15@3888.98,3037.48
  Int3 (Sign) w3: 3857.48,3140 3857.48,3037.48 v1(3873.23,3021.73)
  Int3 (Sign) w4: v2(3698,3327.19) cw(c3736.17,3327.19) 3698.34,3332.28 cw(c3736.17,3327.19) 3709.18,3354.18 3720,3365 cw(c3731.12,3353.88) 3726.16,3368.8 cw(c3727.4,3365) 3727.43,3369 3730.15,3369 3730.69,3369 ccw(c3730.69,3407.74) 3751.63,3375.15 ccw(c3730.69,3407.74) 3753.52,3376.44 ; 3756.85,3379.17 cw(c3730.69,3407.74) 3753.52,3376.44 ; 3857.48,3140 3857.48,3262.48 ccw(c3836.54,3262.48) 3851.35,3277.29 3845.17,3283.46 cw(c3860.08,3298.37) 3839,3298.34 3839,3300 3839,3355.91 ccw(c3811.29,3355.91) 3831.14,3375.25 ccw(c3811.29,3355.91) 3830.82,3375.57 3825.16,3381.23 ccw(c3813.17,3369.34) 3813.17,3386.22 3809.49,3386.22 ccw(c3809.49,3360.46) 3808.18,3386.19 3767.75,3384.19 ccw(c3768.51,3368.21) 3758.09,3380.35 3756.79,3379.24 3753.52,3376.44
FLASH_D10: U1.A17 U3.F3 | length 663.6
  Top Layer w4: v2(3566.44,3286.59) 3569.53,3285.13 3658.65,3285.13 U3.F3@3673.15,3270.63
  Top Layer w5: v1(3936.22,3084.72) U1.A17@3951.97,3100.47
  Int1 (Sign) w3: 3922.5,3140 3922.5,3098.45 v1(3936.22,3084.72)
  Int1 (Sign) w4: v2(3566.44,3286.59) 3569.09,3285 3695.32,3285 cw(c3695.32,3255.98) 3715.83,3276.51 cw(c3714.42,3272.76) 3717.73,3275.01 ccw(c3730.97,3284) 3719.64,3272.7 ; 3719.67,3272.67 ccw(c3730.97,3284) 3730.97,3268 ccw(c3730.97,3284) 3733.2,3268.16 cw(c3733.76,3264.2) 3734.73,3268.08 3734.98,3268.02 3871.14,3268 cw(c3871.14,3217.64) 3906.74,3253.26 cw(c3868.73,3215.23) 3922.5,3215.23 3922.5,3140
FLASH_D11: U1.D14 U3.F4 | length 424.3
  Top Layer w4: U3.F4@3712.52,3270.63 3715.06,3270.63 3728.43,3284 v2(3730.97,3284)
  Top Layer w5: v1(3841.73,2990.24) U1.D14@3857.48,3005.98
  Int4 (Sign) w3: 3824.32,3140 3824.32,3007.65 v1(3841.73,2990.24)
  Int4 (Sign) w4: v2(3730.97,3284) ccw(c3759.86,3255.11) 3719,3255.11 3719,3237.37 ccw(c3758.53,3237.37) 3721.14,3224.54 ccw(c3758.53,3237.37) 3730.58,3209.42 3742.79,3197.21 ccw(c3772.27,3226.69) 3772.27,3185 3807.93,3185 cw(c3807.93,3167.93) 3820,3180 cw(c3809.58,3169.58) 3824.32,3169.58 3824.32,3140
FLASH_D12: U1.D15 U3.F5 | length 854.8
  Top Layer w4: U3.F5@3751.89,3270.63 3751.89,3271.89 v2(3765,3285)
  Top Layer w5: v1(3873.23,2990.24) U1.D15@3888.98,3005.98
  Int1 (Sign) w3: 3630,3140 3649.56,3120.44 cw(c3627.84,3098.72) 3658.55,3098.72 3670,3087.28 3670,3080 3680.49,3069.51 3813.75,3069.51 3825,3058.26 3825,3050.16 3839.24,3035.92 3847.34,3035.92 3858.85,3024.41 3858.85,3016.31 3870.93,3004.24 3870.93,2992.54 v1(3873.23,2990.24)
  Int1 (Sign) w4: 3538.19,3315.16 ccw(c3562.88,3290.52) 3537.98,3314.95 ccw(c3562.88,3290.52) 3537.93,3314.9 ccw(c3562.88,3290.52) 3528,3290.52 3528,3214.02 ccw(c3557.02,3214.02) 3536.49,3193.51 3545,3185 3570.86,3185 cw(c3570.86,3150.86) 3594.98,3175.02 3630,3140 ; 3538.21,3315.19 cw(c3549.51,3303.86) 3561.99,3313.87 ccw(c3565.11,3316.38) 3562.7,3313.18 cw(c3557.59,3306.41) 3563.57,3312.43 ; 3563.59,3312.41 3569.79,3306.21 ccw(c3584.78,3321.19) 3584.78,3300 3740,3300 cw(c3740,3275.86) 3757.07,3292.93 v2(3765,3285)
FLASH_D13: U1.E15 U3.H5 | length 396.9
  Top Layer w4: U3.H5@3751.89,3191.89 v3(3768.9,3208.69)
  Top Layer w5: v1(3873.23,2959) 3873.36,2959 3888.85,2974.49 U1.E15@3888.98,2974.49
  Bottom Layer w3: v1(3873.23,2959) 3873.49,2959 3887.23,2972.74 3887.23,3140
  Bottom Layer w4: v3(3768.9,3208.69) 3771.45,3210 3792.37,3210 3803.37,3199 3806,3199 3822.96,3182.04 3872.96,3182.04 3887.23,3167.77 3887.23,3140
FLASH_D14: U1.E14 U3.G7 | length 536.8
  Top Layer w4: U3.G7@3830.63,3231.26 3833.12,3233.75 3838.75,3233.75 3846.56,3241.56 3846.56,3271.56 3865,3290 3930,3290 3941.93,3278.07 v2(3943.1,3275.08)
  Top Layer w5: v1(3841.73,2959) 3841.86,2959 3857.35,2974.49 U1.E14@3857.48,2974.49
  Int6 (Sign) w3: v1(3841.73,2959) 3841.99,2959 3857.48,2974.49 3857.48,3138.17 cw(c3891.21,3125) 3858.25,3140
  Int6 (Sign) w4: 3858.25,3140 cw(c3891.21,3125) 3865.61,3150.61 3915,3200 ccw(c3847.16,3267.84) 3939,3240.09 ccw(c3847.16,3267.84) 3940.78,3246.87 ccw(c3847.16,3267.84) 3943.1,3267.84 v2(3943.1,3275.08)
FLASH_D15: U1.D17 U3.E7 | length 517.2
  Top Layer w4: U3.E7@3830.63,3310 3845.13,3324.5 3905.5,3324.5 3918.44,3311.56 v2(3919.04,3311.07)
  Top Layer w5: v1(3936.22,2990.24) U1.D17@3951.97,3005.98
  Int3 (Sign) w3: v1(3936.22,2990.24) 3960.71,3014.73 ccw(c3890,3085.44) 3990,3085.44 3990,3140
  Int3 (Sign) w4: v2(3919.04,3311.07) 3919.67,3311 3960,3311 cw(c3960,3288.11) 3976.19,3304.29 3978.19,3302.29 cw(c3949.69,3273.79) 3990,3273.79 3990,3140
GND: C2.1 C3.1 C4.1 C5.1 C6.2 C7.2 C8.1 C9.1 C10.1 C11.1 C12.1 C13.1 C14.1 C15.1 C16.1 C17.1 C18.1 C19.1 C20.1 C21.1 C22.1 C23.1 C24.1 C25.1 C26.1 C27.1 C28.1 C29.1 C30.1 C31.1 C32.1 C33.1 C34.1 C35.1 C36.1 C37.1 C38.1 C39.2 C40.1 C41.1 C42.1 D1.3 J1.1 R2.1 U1.A1 U1.A13 U1.A20 U1.B11 U1.D1 U1.D4 U1.E3 U1.E7 U1.F3 U1.F6 U1.F14 U1.G9 U1.G10 U1.G11 U1.H7 U1.H8 U1.H9 U1.H10 U1.H11 U1.H12 U1.J7 U1.J8 U1.J9 U1.J10 U1.J11 U1.J12 U1.K7 U1.K8 U1.K9 U1.K10 U1.K11 U1.K12 U1.K13 U1.L7 U1.L8 U1.L9 U1.L10 U1.L11 U1.L12 U1.L13 U1.L14 U1.M6 U1.M7 U1.M8 U1.M9 U1.M10 U1.M11 U1.M12 U1.M13 U1.M14 U1.N6 U1.N7 U1.N8 U1.N9 U1.N10 U1.N11 U1.N12 U1.N13 U1.N14 U1.N20 U1.P8 U1.P9 U1.P10 U1.P11 U1.P12 U1.P13 U1.R9 U1.R13 U1.R14 U1.R16 U1.U8 U1.V6 U1.Y1 U1.Y20 U2.A1 U2.A3 U2.B8 U2.C2 U2.D8 U2.E2 U2.F2 U2.M3 U3.B2 U3.H2 U3.H4 U3.H6 U4.61 U4.64 U4.68 U4.183 U4.184 U4.201 U4.202 U4.203 U4.204 U4.205 U4.206 U4.207 U4.208 U4.209 U4.210 U4.213 U4.214 U4.215 U4.216 U4.217 U4.218 U4.219 U4.220 U4.221 U4.222 U5.2 Y1.2 | length 5676.3
  Top Layer w4: C42.1@3260.59,2870 3259.24,2868.65 C41.1@3259.24,2805 3259.24,2760.09 3264.26,2755.07 3262,2752.81 v2(3262,2750) ; v2(3275,3080) 3279.5,3084.5 C4.1@3279.5,3120 ; v2(3393,3070) v2@3395,3070 ; v2(3599.9,4204.56) 3600,4204.67 3600,4215 3608.11,4223.11 U2.A1@3626.02,4223.11 ; U3.H2@3633.78,3191.89 3641.67,3184 3655.03,3184 3661.64,3177.39 3698.02,3177.39 U3.H4@3712.52,3191.89 ; U3.B2@3633.78,3428.11 3649.76,3444.09 v2(3649.35,3450.11) ; U2.F2@3657.52,4026.26 3672.52,4041.26 3696.11,4041.26 3712.37,4025 v2(3715,4025) ; U2.E2@3657.52,4065.63 3660.96,4065.63 3680.33,4085 v2(3710.16,4085) ; U2.C2@3657.52,4144.37 3660.96,4144.37 3676.59,4160 3718.81,4160 v2(3720,4158.81) ; U2.A3@3685.58,4223.11 U2.A3@3689.02,4223.11 3705.91,4240 v2(3715,4240) ; U2.M3@3689.02,3790.04 3690,3789.06 v2(3690,3770) ; U3.H4@3713.53,3191.47 3713.53,3190.88 3727.02,3177.39 3759.56,3177.39 3774.06,3191.89 U3.H6@3791.26,3191.89 3791.26,3195.41 3808.83,3212.98 3810.49,3216.25 v2(3810.72,3216.66) ; U2.D8@3846.5,4105 3861.5,4090 3903.69,4090 3970,4023.69 v2(3970,4020) ; U2.B8@3846.5,4183.74 3870.87,4159.37 3929.44,4159.37 v2(3930,4158.81) ; v2(4089,3285) 4089,3284.37 4100,3273.37 Y1.2@4100,3225 ; C40.1@4190.39,2826.16 C40.1@4199.24,2835 4221.16,2835 4226.76,2840.6 4226.76,2846.24 4232.36,2851.84 4298.16,2851.84 4305,2845 ; J1.1@4276.73,2607.6 4276.73,2590.52 4315,2552.25 v2(4315,2535) ; C3.1@4290.76,3555 4295.84,3555 4304.69,3563.84 4304.69,3577.58 4310.66,3577.58 4313,3579.93
  Top Layer w5: C4.1@3279.5,3120 C4.1@3280.5,3120 ; v2@3395,3070 3401.92,3070 3432.39,3100.47 U1.A1@3448.03,3100.47 ; v1@3414.99,3005.98 U1.D1@3448.03,3005.98 ; 3416.03,2486.3 3432.28,2486.3 v1@3434.13,2488.15 ; v1(3432.28,2490) v1@3434.13,2488.15 ; U1.Y1@3448.03,2502.05 v1@3434.13,2488.15 ; U1.F3@3511.02,2942.99 v1(3526.77,2927.24) ; U1.E3@3511.02,2974.49 v1(3526.77,2958.74) ; U1.D4@3542.52,3005.98 v1(3558.27,3021.73) ; v1(3589.76,2549.29) U1.V6@3605.51,2565.04 ; v1(3589.76,2706.77) U1.N6@3605.51,2722.52 ; U1.M6@3605.51,2754.02 v1(3621.26,2769.76) ; U1.F6@3605.51,2942.99 v1(3621.26,2958.74) ; v1(3621.26,2706.77) U1.N7@3637.01,2722.52 ; v1(3621.26,2739) 3621.63,2739 3636.64,2754.02 U1.M7@3637.01,2754.02 ; U1.L7@3637.01,2785.51 3637.14,2785.51 3652.63,2801 v1(3652.76,2801) ; U1.K7@3637.01,2817.01 v1(3652.76,2832.76) ; U1.J7@3637.01,2848.5 v1(3652.76,2864.25) ; U1.H7@3637.01,2880 v1(3652.76,2895.75) ; U1.E7@3637.01,2974.49 v1(3652.76,2990.24) ; v1(3652.76,2580.79) U1.U8@3668.5,2596.54 ; v1(3652.76,2675.28) U1.P8@3668.5,2691.02 ; v1(3652.76,2706.77) U1.N8@3668.5,2722.52 ; v1(3652.76,2739) 3653.12,2739 3668.14,2754.02 U1.M8@3668.5,2754.02 ; v1(3652.76,2769.76) U1.L8@3668.5,2785.51 ; U1.K8@3668.5,2817.01 v1(3684.25,2832.76) ; U1.J8@3668.5,2848.5 v1(3684.25,2864.25) ; U1.H8@3668.5,2880 v1(3684.25,2895.75) ; v1(3684.25,2644) 3684.36,2644 3699.89,2659.53 U1.R9@3700,2659.53 ; v1(3684.25,2706.77) U1.N9@3700,2722.52 ; v1(3684.25,2739) 3684.62,2739 3699.63,2754.02 U1.M9@3700,2754.02 ; v1(3684.25,2769.76) U1.L9@3700,2785.51 ; v1(3684.39,2675.41) U1.P9@3700,2691.02 ; U1.K9@3700,2817.01 3715.75,2801.26 v1(3715.75,2801) ; U1.J9@3700,2848.5 v1(3715.75,2832.76) ; U1.H9@3700,2880 v1(3715.75,2864.25) ; U1.G9@3700,2911.5 v1(3715.75,2927.24) ; v1(3715.75,2675.28) U1.P10@3731.5,2691.02 ; v1(3715.75,2706.77) U1.N10@3731.5,2722.52 ; v1(3715.75,2739) 3716.11,2739 3731.13,2754.02 U1.M10@3731.5,2754.02 ; v1(3715.75,2769.76) U1.L10@3731.5,2785.51 ; v1(3715.75,2895.75) U1.G10@3731.5,2911.5 ; U1.K10@3731.5,2817.01 v1@3747.24,2801.26 ; U1.J10@3731.5,2848.5 v1(3747.24,2864.25) ; U1.H10@3731.5,2880 v1(3747.24,2864.25) ; v1(3747.24,2675.28) U1.P11@3762.99,2691.02 ; v1(3747.24,2706.77) U1.N11@3762.99,2722.52 ; v1(3747.24,2739) 3747.61,2739 3762.63,2754.02 U1.M11@3762.99,2754.02 ; v1(3747.24,2769.76) U1.L11@3762.99,2785.51 ; v1(3747.24,2801) v1@3747.24,2801.26 ; v1(3747.24,2832.76) U1.J11@3762.99,2848.5 ; v1(3747.24,2895.75) U1.G11@3762.99,2911.5 ; U1.K11@3762.99,2817.01 v1@3747.24,2801.26 ; U1.H11@3762.99,2880 v1(3747.24,2864.25) ; U1.B11@3762.99,3068.98 v1(3778.74,3084.72) ; v1(3778.74,2675.28) U1.P12@3794.49,2691.02 ; v1(3778.74,2706.77) U1.N12@3794.49,2722.52 ; v1(3778.74,2739) 3779.11,2739 3794.12,2754.02 U1.M12@3794.49,2754.02 ; v1(3778.74,2769.76) U1.L12@3794.49,2785.51 ; v1(3778.74,2801) 3778.74,2801.26 U1.K12@3794.49,2817.01 ; v1(3778.74,2832.76) U1.J12@3794.49,2848.5 ; v1(3778.74,2864.25) U1.H12@3794.49,2880 ; v1(3810.24,2675.28) U1.P13@3825.98,2691.02 ; v1(3810.24,2706.77) U1.N13@3825.98,2722.52 ; v1(3810.24,2738.27) U1.M13@3825.98,2754.02 ; v1(3810.24,2769.76) U1.L13@3825.98,2785.51 ; v1(3810.24,2801) 3810.24,2801.26 U1.K13@3825.98,2817.01 ; v1(3810.46,2644) U1.R13@3825.98,2659.53 ; U1.A13@3825.98,3100.47 3826.59,3100.47 3841.12,3115 v1(3841.73,3115) ; v1(3841.63,2769.94) U1.L14@3857.48,2785.51 ; v1(3841.73,2644) 3841.84,2644 3857.37,2659.53 U1.R14@3857.48,2659.53 ; v1(3841.73,2706.77) U1.N14@3857.48,2722.52 ; v1(3841.73,2738.27) U1.M14@3857.48,2754.02 ; v1(3841.73,2927.24) U1.F14@3857.48,2942.99 ; v1(3904.72,2644) 3904.83,2644 3920.36,2659.53 U1.R16@3920.47,2659.53 ; v1(4030.71,2486.3) U1.Y20@4046.46,2502.05 ; U1.N20@4046.46,2722.52 4047.72,2721.26 4063.74,2721.26 v1(4065,2720) ; v1@4060,3110 4062.45,3112.45 4086.45,3112.45 v2(4089,3115)
  Top Layer w25: C5.1@3190,3345.5 3190,3346.5 3197.5,3354 3198.5,3354 3204.5,3360 3265,3360 v2(3270,3365) ; C35.1@3325,2219.24 C36.1@3365,2219.24 C37.1@3405,2219.24 C38.1@3445,2219.24 3520.76,2219.24 3527.5,2212.5 3530.46,2209.54 3551.17,2209.54 v2(3560.2,2210.2) ; C39.2@3545,2130.89 3545,2195 ; C2.1@3671.66,4288.51 3713.48,4288.51 R2.1@3720,4295 ; v2(3715,4240) 3715,4290 R2.1@3720,4295 ; v2(3970,2170) 3970,2215.59 C31.1@3965,2220.59 4143.12,2220.59 4150,2227.47 C34.1@4150,2229.24
  Int4 (Sign) w3: v1@3684.25,2643.78 v1(3684.25,2644) ; v1(3810.46,2644) 3811.48,2642.98 v1@3811.48,2642.54 ; v1@3841.73,2643.78 v1(3841.73,2644)
  Int6 (Sign) w3: v1@3715.49,2801 v1(3715.75,2801)
  Bottom Layer w3: v1(3414.99,3005.2) 3418.05,3002.14 3418.05,2991.95 3420,2990 3439.09,2990 3440.79,2988.31 U4.216@3459.88,2988.31 U4.216@3458.19,2990 ; v1(3420.15,2753.27) 3421.25,2743.32 3424.76,2739.81 3447.6,2739.81 U4.217@3459.88,2752.09 ; U4.206@4015,2752.09 4032.72,2752.09 4064.8,2720 v1(4065,2720) ; U4.61@4015,2880.04 4050.04,2880.04 4065,2895 v1(4065,2950) ; U4.64@4015,2939.09 4054.09,2939.09 v1(4065,2950) ; U4.68@4015,3057.2 4033,3057.2 ccw(c4033,3091.98) 4057.58,3067.38 ; U4.207@4040.85,2988.31 4040.85,2980.18 4061.94,2959.08 4061.94,2953.06 v1(4065,2950) ; 4052.8,3062.59 4060.93,3070.72 4068,3070.72 4080,3082.72
  Bottom Layer w4: U4.222@3219.72,2752.09 3221.81,2750 v2(3262,2750) ; U4.221@3219.72,2988.31 3221.42,2990 v2(3270,2990) ; U4.220@3219.72,3224.53 3231.5,3236.31 3265.69,3236.31 3265.69,3242.66 3267.16,3242.66 v2(3269.5,3245) ; U4.218@3219.72,3696.97 3257.22,3696.97 3267.26,3686.93 v2(3268.16,3686.93) ; v2(3370,3245) 3390.47,3224.53 U4.215@3459.88,3224.53 ; U4.213@3459.88,3696.97 3477.6,3696.97 3509.57,3665 v2(3540,3665) ; C7.2@3585,3605.87 3600,3620.87 v2(3600,3658.5) ; v2(3820,3700) U5.2@3820,3735 ; v2(3965,3470) 4005.75,3470 U4.209@4015,3460.75 ; v2(3965,3671.5) 3965,3673.31 3956.66,3681.66 3971.97,3696.97 U4.210@4015,3696.97 ; v2(4184.38,3230.62) 4186.52,3230 4189.33,3230 4194.33,3225 4195,3225 4195.47,3224.53 U4.203@4255.16,3224.53 ; v2(4185,2910) 4185,2950 4211.53,2976.53 4243.38,2976.53 U4.204@4255.16,2988.31 4261,2988.31 4272.78,2976.53 4272.78,2973.03 ; v2(4200,3710) ccw(c4231.46,3741.46) 4231.46,3696.97 U4.201@4255.16,3696.97 ; v2(4210.78,2759.22) 4211.57,2760 4247.24,2760 U4.205@4255.16,2752.09
  Bottom Layer w5: v2(3955.97,3225.4) U4.208@4015,3224.53 ; 4080.02,3082.74 ccw(c4058.27,3104.45) 4089,3104.45 v2(4089,3115)
  Bottom Layer w10: U4.183@3219.72,3391.85 3263.15,3391.85 3269.01,3385.99 3269.01,3365.99 v2(3270,3365) ; U4.184@3219.72,3411.54 3220.63,3412.44 3257.44,3412.44 3269.25,3424.25 3269.25,3456.19 v2(3270,3460) ; U4.219@3219.72,3460.75 v2@3269.25,3460.75 ; v2(3400,3465) 3455.63,3465 cw(c3455.63,3460.75) U4.214@3459.88,3460.75
  Bottom Layer w25: D1.3@3635,3490 3635,3497 3675,3537 v2(3675,3591.5)
  other v1: 4059.44,3109.9
JTAG_E\M\U\: U1.R5 U4.51 | length 1296.3
  Top Layer w5: v1(3558.27,2643.78) U1.R5@3574.02,2659.53
  Int3 (Sign) w3: 3395,2628.03 3528.5,2628.03 ccw(c3528.5,2661.88) 3552.4,2637.91 v1(3558.27,2643.78)
  Int3 (Sign) w4: 3395,2628.03 3394.77,2628.03 ccw(c3394.77,2611.76) 3383.27,2623.27 3377.07,2617.07 ccw(c3394.14,2600) 3370,2600 3370,2429.03 ccw(c3389.53,2429.03) 3375.72,2415.23 ccw(c3393.55,2433.05) 3393.55,2407.84 3399.4,2407.84 3831.63,2407.84 3843.05,2403.11 ; 3843.08,2403.09 3853.09,2393.08 ccw(c3875,2414.99) 3875,2384 3948.44,2384 ccw(c3948.44,2421.56) 3975,2395 ccw(c3950.86,2419.14) 3985,2419.14 v2(3985,2451)
  Bottom Layer w3: 3998.76,2455 ccw(c3986.3,2472.41) 4001.42,2457.25 ; 4001.44,2457.27 ccw(c3968.72,2490) 4015,2490 U4.51@4015,2643.82
  Bottom Layer w4: v2(3985,2451) 3986.3,2451 ccw(c3986.3,2472.41) 3998.76,2455
JTAG_T\R\S\T\: U1.T5 U4.52 | length 1282.7
  Top Layer w5: v1(3558.27,2612.28) U1.T5@3574.02,2628.03
  Int3 (Sign) w3: 3395,2594.11 cw(c3406.19,2574.14) 3406.19,2597.04 3532.25,2597.04 ccw(c3532.25,2623.04) 3550.62,2604.63 ; 3550.64,2604.65 v1(3558.27,2612.28) ; 3950,2455 cw(c3974.24,2430.76) 3972.47,2465 3984.39,2465.49 cw(c3985,2451) 3987.06,2465.35 3989.56,2465 3992.05,2465 4037.93,2465 ccw(c4037.93,2482.07) 4050,2470 ccw(c4037.93,2482.07) 4055,2482.07 4055,2497.93 ccw(c4037.93,2497.93) 4050,2510 ccw(c4037.93,2497.93) 4037.93,2515 v1(4030,2515)
  Int3 (Sign) w4: 3394.98,2594.09 ccw(c3419.07,2570) 3390,2587.77 ccw(c3419.07,2570) 3385,2570 3385,2479.38 ccw(c3454.29,2479.38) 3390.21,2453.03 ccw(c3454.29,2479.38) 3390.88,2451.45 ccw(c3454.29,2479.38) 3405.29,2430.39 ccw(c3436.21,2471.21) 3436.21,2420 3905,2420 ccw(c3905,2444.14) 3922.07,2427.07 3950,2455
  Bottom Layer w3: U4.52@4015,2663.5 4039.63,2663.5 cw(c4039.63,2641.76) 4055,2657.14 4055,2638.98 ccw(c4068.65,2635.85) 4055,2632.72 4055,2570 cw(c3982.57,2570) 4033.79,2518.79 v1(4030,2515)
JTAG_TCK: U1.V3 U4.56 | length 1306.5
  Top Layer w4: v2(3835.35,2388.19) cw(c3863.86,2359.68) 3853.7,2398.7 cw(c3863.86,2359.68) 3863.86,2400 3884.53,2400 v2(3885.03,2400.03)
  Top Layer w5: v1(3495.28,2549.29) U1.V3@3511.02,2565.04
  Bottom Layer w3: v1(3495.28,2549.29) 3512,2532.57 3512,2455 ; U4.56@4015,2781.61 4040.59,2781.61 4080,2742.2
  Bottom Layer w4: 3512,2455 3512,2434.14 ccw(c3538.14,2434.14) 3519.66,2415.66 ccw(c3538.14,2434.14) 3538.14,2408 3786.51,2408 cw(c3786.51,2340.36) 3820.23,2399 cw(c3786.51,2340.36) v2@3834.31,2388.22 ; v2@3834.34,2388.19 v2(3835.35,2388.19) ; v2(3885.03,2400.03) 3888.69,2400 4106.21,2400 ccw(c4106.21,2500) 4176.86,2429.24 ccw(c4106.21,2500) 4176.92,2429.29 4218.1,2470.47 4218.1,2571.9 4156.86,2633.14 cw(c4170.61,2646.88) 4151.17,2646.88 4151.17,2654.93 ccw(c4112.3,2654.93) 4139.8,2682.41 4113.7,2708.5 4080,2742.2
JTAG_TDI: U1.V5 U4.55 | length 1182.9
  Top Layer w5: v1(3558.27,2549.29) U1.V5@3574.02,2565.04
  Int3 (Sign) w3: v2@3557.01,2455.01 3540.77,2471.24 3540.77,2531.8 v1(3558.27,2549.29)
  Int3 (Sign) w5: v2@3557.02,2455 v2(3557.98,2454)
  Bottom Layer w3: U4.55@4015,2722.56 4040.59,2722.56 4080,2683.15
  Bottom Layer w4: v2(3557.98,2454) 3558.5,2452.31 3558.5,2435.39 ccw(c3567.89,2435.39) 3561.25,2428.75 ccw(c3567.89,2435.39) 3567.89,2426 4146.98,2426 ccw(c4146.98,2463.02) 4173.16,2436.84 4210.1,2473.79 4210.1,2568.58 4151.2,2627.49 cw(c4170.61,2646.88) 4144.03,2640.06 ccw(c4140.16,2639.07) 4143.25,2641.61 4143.19,2641.68 ; 4080,2683.15 4089.41,2673.74 ccw(c4112.14,2696.46) 4112.14,2664.32 4119.44,2664.32 cw(c4119.44,2646.71) 4131.88,2659.18 ; 4131.89,2659.16 4138.8,2652.26 cw(c4128.24,2641.7) 4143.17,2641.7
JTAG_TDO: U1.V4 U4.54 | length 1140.5
  Top Layer w5: v1(3526.77,2549.29) U1.V4@3542.52,2565.04
  Int1 (Sign) w3: 3541.64,2564.16 cw(c3543.76,2562.04) 3543.79,2565.04
  Bottom Layer w3: v1(3526.77,2549.29) 3526.77,2548.23 3540,2535 3565,2535 3575,2525 3575,2455 ; U4.54@4015,2702.87 4040.59,2702.87 4080,2663.46
  Bottom Layer w4: 3575,2455 3575,2444.24 ccw(c3585.24,2444.24) 3577.99,2437.01 ccw(c3582.82,2441.81) 3582.82,2435 4135,2435 ccw(c4135,2495.36) 4177.68,2452.68 4202.1,2477.1 4202.1,2562.9 4147.61,2617.39 ccw(c4129.23,2599) 4129.23,2625 cw(c4129.23,2651) 4110.87,2632.6 4080,2663.46
JTAG_TMS: U1.U5 U4.53 | length 1234.5
  Top Layer w5: v1(3558.27,2580.79) U1.U5@3574.02,2596.54
  Int3 (Sign) w3: 3404.85,2455 cw(c3448.8,2473.8) 3401,2473.8 3401,2533.27 cw(c3431.73,2533.27) 3410,2555 cw(c3434.72,2530.28) 3434.72,2565.24 3530,2565.24 ccw(c3530,2595.95) 3551.71,2574.23 v1(3558.27,2580.79) ; 3925,2455 3930,2460 cw(c3959.77,2430.23) 3959.77,2472.33 3963.36,2472.33 3967.61,2472.3 ccw(c3967.72,2486.3) 3977.62,2476.4 ccw(c3959.79,2494.23) 3985,2494.23 3985,2547.93 cw(c4002.07,2547.93) 3990,2560 cw(c4014.14,2535.86) 4014.14,2570 4080,2570
  Int3 (Sign) w4: 3404.85,2455 ccw(c3448.8,2473.8) 3415,2440 ccw(c3443.97,2468.97) 3433.67,2429.32 ; 3431.93,2429.81 ccw(c3443.97,2468.97) 3432.07,2429.77 3433.2,2429.42 ccw(c3434.21,2432.77) 3433.67,2429.32 ; 3925,2455 3910.73,2440.73 cw(c3880,2471.46) 3880,2428 3443.97,2428 3435.93,2429 cw(c3443.97,2493.89) 3433.67,2429.32 ; 4080,2570 4089.42,2570 ccw(c4089.42,2572.83) v2(4091.43,2570.83)
  Bottom Layer w4: U4.53@4015,2683.19 4018.91,2679.28 4045.72,2679.28 4092.51,2632.5 4092.51,2573.56 v2(4091.43,2570.83)
N\M\I\: U1.C11 U4.34 | length 591.8
  Top Layer w5: U1.C11@3762.99,3037.48 v1(3778.74,3053.23)
  Int1 (Sign) w3: v1(3778.74,3053.23) 3781.04,3050.93 3781.04,3039.23 3794.87,3025.4 3794.87,3017.3 3805.5,3006.67 3813.6,3006.67 3824.3,2995.97 3824.3,2985.7 3835,2975 3880,2975 3887.42,2982.42 3887.42,2992.73 3902.42,3007.73 3910.52,3007.73 3918.72,3015.93 3918.72,3024.04 3930.42,3035.73 4005,3035.73 cw(c4015.3,3025.43) 4015.3,3040 4080,3040
  Int1 (Sign) w4: 4080,3040 v2(4093.23,3039.51)
  Bottom Layer w4: v2(4093.23,3039.51) 4095.66,3040.66 4101,3046 4176.63,3046 4182.61,3040.02 4207.23,3040.02 4209.73,3037.52 U4.34@4255.16,3037.52